# Altium PCB WIFI_BoardV4.00.PcbDoc (part 3 of 3)
Units mil, origin at the board's own origin, x right, y up, seen from the top; angles counter-clockwise.
Board outline 4329.7 x 2342.16 mil, 2 copper layers (Top Layer, Bottom Layer), stack 61.811 mil thick; 89 components, 60 nets, 295 pads, 130 vias.
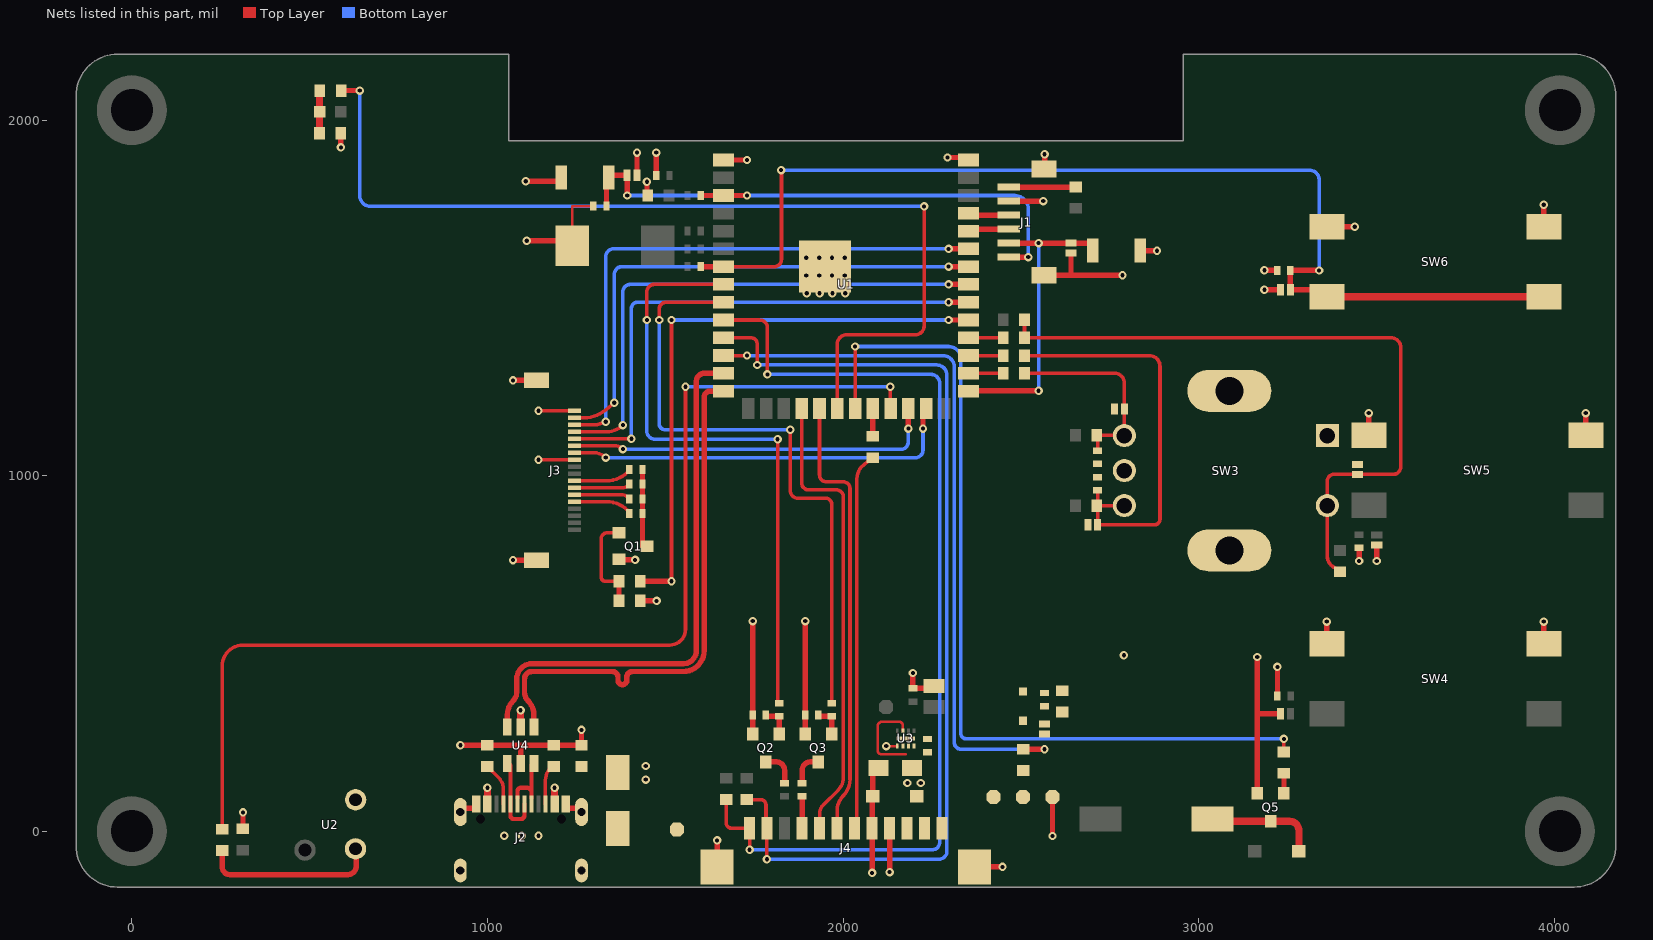
[diagram p2: the nets of this part, all layers, seen from the top]

## Via types
v1: diameter 23.62, hole 11.81, Top Layer to Bottom Layer, tented both sides, 129 vias
v2: diameter 23.62, hole 11.81, Top Layer to Bottom Layer, 1 vias

## Nets (pads, with @x,y where several pads share a name; then routed paths per layer and width w, separated by ;. In a path a pad name is that pad's centre, name@x,y a point inside that pad or via, vN(x,y) a via of type N, cw(c..) or ccw(c..) an arc to the next point about the centre after c; other vN are vias at no path point) (continued)
BTN_3: C14.2 D7.2 R21.1 SW6.1 SW6.2 U1.7 | length 3134.1
  Top Layer w10: U1.7@1664.16,1587.71 1806.66,1587.71 ccw(c1806.66,1608.06) 1827,1608.06 1827,1858.15 ccw(c1826,1858.15) v1(1826,1859.15)
  Top Layer w15: R21.1@1599.52,1587.71 U1.7@1664.16,1587.71 ; v1(3338.88,1576.73) 3338.88,1577.31 C14.2@3258,1577.31 D7.2@3258,1522.97 3340.4,1522.97 cw(c3340.4,1502.97) SW6.2@3360.4,1502.97
  Top Layer w20: SW6.2@3360.4,1502.97 SW6.1@3970.64,1502.97
  Bottom Layer w10: v1(1826,1859.15) 3311.34,1859.15 cw(c3311.34,1831.6) 3338.88,1831.6 v1(3338.88,1576.73)
BUZZER: R28.1 U1.21 | length 2499.3
  Top Layer w10: U1.21@2033.85,1188.5 v1(2033.85,1363.15) ; v1(3239.76,259.47) 3239.76,223.05 R28.1@3239.92,222.89
  Bottom Layer w10: v1(2033.85,1363.15) 2297.2,1363.15 cw(c2297.2,1328.95) 2331.4,1328.95 2331.4,274.89 ccw(c2346.29,274.89) 2346.29,260 v1@3239.76,260
ENC_CHA: C1.2 D13.2 R2.1 R33.2 SW3.A | length 561.5
  Top Layer w10: R33.2@2510.36,1287.71 2763.75,1287.71 cw(c2763.75,1260.14) 2791.33,1260.14 2791.33,1114.9 cw(c2789.83,1114.9) 2789.83,1113.4 R2.1@2713.92,1113.4 ; C1.2@2716.01,1070.06 R2.1@2716.01,1111.31
ENC_CHB: C6.2 D12.2 R3.2 R34.2 SW3.B | length 1185.9
  Top Layer w10: R34.2@2510.36,1337.71 2861.12,1337.71 cw(c2861.12,1307.36) 2891.47,1307.36 2891.47,877.48 cw(c2875.73,877.48) 2875.73,861.73 D12.2@2716.02,861.73 2716.02,912.88 ccw(c2713.92,912.88) R3.2@2713.92,914.97 SW3.B@2791.2,914.97 ; R3.2@2716.16,917.21 C6.2@2716.16,958.6
ENC_SW: D11.2 R30.2 R31.2 R32.1 SW3.2 | length 1959.3
  Top Layer w10: R30.2@2510.36,1437.71 R31.2@2510.36,1387.71 3540.91,1387.71 cw(c3540.91,1360.4) 3568.22,1360.4 3568.22,1024.62 cw(c3547.14,1024.62) 3547.14,1003.54 D11.2@3446.53,1003.54 3380,1003.54 ccw(c3380,985.6) 3362.06,985.6 SW3.2@3362.06,915.76 3362.06,773.23 ccw(c3397.59,773.23) 3380.23,742.23 3385.09,739.5 R32.1@3397.59,729.5
ESP_EN: C5.2 D4.2 J1.6 R1.1 SW1.1 U1.3 | length 1668.1
  Top Layer w15: C5.2@1334.89,1758 1334.89,1827.8 1341.52,1827.8 cw(c1358.25,1827.8) 1358.25,1844.53 D4.2@1392.96,1844.53 v1(1392.96,1787.71) ; R1.1@1599.52,1787.71 U1.3@1664.16,1787.71 v1(1730,1787.71) ; J1.6@2465.52,1614.57 v1(2521.08,1614.57) cw(c2521.08,1612.55) v1@2523.11,1612.55
  Bottom Layer w10: v1(1392.96,1787.71) v1(1730,1787.71) 2482.36,1787.71 cw(c2482.36,1749) 2521.08,1749 v1(2521.08,1614.57)
ESP_IO0: D8.2 J1.5 SW2.1 U1.27 | length 848
  Top Layer w15: U1.27@2353.14,1237.71 2353.71,1238.29 2549.43,1238.29 v1(2550,1238.86) ; J1.5@2465.52,1653.94 v1(2550,1653.94) D8.2@2641.01,1653.94 SW2.1@2701.09,1653.94
  Bottom Layer w10: v1(2550,1238.86) v1(2550,1653.94)
ESP_RXD0: J1.4 U1.36 | length 115.6
  Top Layer w15: U1.36@2353.14,1687.71 cw(c2358.74,1687.71) 2358.74,1693.31 J1.4@2465.52,1693.31
ESP_RXD1: J4.2 R22.1 U1.11 | length 2794.7
  Top Layer w10: U1.11@1664.16,1387.71 1741.01,1387.71 cw(c1741.01,1370) 1758.73,1370 v1(1758.73,1311.17) ; R22.1@1729.82,89 1768.37,89 cw(c1768.37,74) 1783.37,74 1783.37,10.94 ccw(c1786,10.94) 1786,8.31 v1(1786,-79) 1786,-84 cw(c1785,-84) v1@1785,-85
  Bottom Layer w10: v1(1758.73,1311.17) 2263.87,1311.17 cw(c2263.87,1282.81) 2292.23,1282.81 2292.23,-56.34 cw(c2269.57,-56.34) 2269.57,-79 v1(1786,-79)
ESP_RXD2: J4.6 U1.19 | length 1259.4
  Top Layer w10: U1.19@1933.85,1188.5 1933.85,1001.85 ccw(c1953.1,1001.85) 1953.1,982.6 2000.85,982.6 cw(c2000.85,963.75) 2019.7,963.75 2019.7,146.14 cw(c1953.06,146.14) 2000.18,99.01 ccw(c2040.57,58.62) 1983.46,58.62 J4.6@1983.46,8.31
ESP_TXD0: J1.3 U1.37 | length 115.3
  Top Layer w15: U1.37@2353.14,1737.71 ccw(c2358.17,1737.71) 2358.17,1732.68 J1.3@2465.52,1732.68
ESP_TXD1: J4.1 R29.1 U1.10 | length 2803.8
  Top Layer w10: U1.10@1664.16,1437.71 1764.97,1437.71 cw(c1764.97,1415.23) 1787.45,1415.23 v1(1787.45,1284.63) ; R29.1@1671,89 1671,24.42 ccw(c1687.12,24.42) 1687.12,8.31 J4.1@1737.39,8.31 v1(1737.39,-52.39)
  Bottom Layer w10: v1(1737.39,-52.39) 2250.61,-52.39 ccw(c2250.61,-30.99) 2272.01,-30.99 2272.01,1259.57 ccw(c2246.95,1259.57) 2246.95,1284.63 v1(1787.45,1284.63)
ESP_TXD2: J4.5 U1.18 | length 1304.7
  Top Layer w10: U1.18@1883.85,1188.5 1883.85,979.25 ccw(c1903.09,979.25) 1903.09,960 1981.11,960 cw(c1981.11,940.02) 2001.09,940.02 2001.09,151.46 cw(c1950.38,151.46) 1986.24,115.6 1944.17,73.54 ccw(c1968.13,49.57) 1934.24,49.57 J4.5@1934.24,8.31
GND: C1.1 C2.2 C3.1 C4.1 C5.1 C6.1 C7.2 C8.1 C9.2 C10.1 C11.1 C12.1 C13.1 C14.1 C15.1 C16.2 D2.1 D4.1 D5.1 D6.1 D7.1 D8.1 D9.1 D10.1 D11.1 D12.1 D13.1 J1.2 J1.MP1 J1.MP2 J2.A1/B12 J2.B1/A12 J2.S1 J2.S2 J2.S3 J2.S4 J3.1 J3.8 J3.MP1 J3.MP2 J4.8 J4.9 J4.MP1 J4.MP2 P3.1 Q1.2 Q2.2 Q3.2 Q5.2 R5.2 R6.2 R12.2 R17.1 R18.1 R24.1 R26.2 SW1.2 SW2.2 SW3.1 SW3.COM SW3.S1 SW3.S2 SW4.3 SW4.4 SW5.3 SW5.4 SW6.3 SW6.4 U1.1 U1.40 U1.41 U2.3 U3.5 U3.9 U4.2 | length 4743
  Top Layer w7: C2.2@1238.76,1660.42 1238.76,1758 C5.1@1297.89,1758 ; v1(2121.58,239.29) U3.5@2152.52,239.29
  Top Layer w10: v1(1143.71,1044.66) J3.8@1244.48,1044.66 ; v1(1143.71,1182.46) J3.1@1244.48,1182.46
  Top Layer w15: C16.2@312.52,6.82 v1(312.52,53) ; R26.2@587,1961.95 cw(c587.94,1961.95) R26.2@587.94,1962.89 v1(587.94,1922.94) ; J2.S4@924.02,53.95 924.02,54.99 933.45,64.43 964,64.43 968.31,68.74 J2.A1/B12@968.31,76.39 ; v1(924.02,241.75) R5.2@999.8,241.75 999.8,241.97 1093.32,241.97 ; v1@1070,1266 cw(c1071.89,1266) v1(1071.89,1267.89) J3.MP1@1138.18,1267.89 ; v1(1071.89,762.38) J3.MP2@1138.18,762.38 ; U4.2@1093.32,190.4 1093.32,241.97 ; v1@1108,1658 cw(c1110.42,1658) v1(1110.42,1660.42) C2.2@1238.76,1660.42 ; v1(1108,1827.8) SW1.2@1207.66,1827.8 ; J2.B1/A12@1224.59,64.43 J2.S1@1255.13,64.43 ; v1(1264.57,285) C11.1@1264.57,241.75 R6.2@1186.88,241.75 1186.88,241.97 1093.32,241.97 ; Q1.2@1370.22,764.27 ccw(c1371.49,764.27) 1371.49,763 v1(1415.21,763) ; D4.1@1420.52,1844.53 v1(1420.52,1908.34) ; R12.2@1430.21,647.68 v1(1475.63,647.68) ; C4.1@1448.52,1787.71 v1(1448.52,1826.28) ; v1@1449,1827.8 cw(c1449,1826.28) v1@1450.52,1826.28 ; C3.1@1475.02,1844.53 v1(1475.02,1908.34) ; v1@1644,-24 cw(c1644,-25.86) v1(1645.86,-25.86) J4.MP1@1645.86,-100.35 ; U1.1@1664.16,1887.71 v1(1730,1887.71) ; Q2.2@1745.97,273.74 R17.1@1745.97,326.39 v1(1745.97,591) ; Q3.2@1893.6,273.74 R18.1@1893.6,326.39 v1(1893.6,591) ; v1@2080,-119 ccw(c2080,-117.12) v1(2081.88,-117.12) J4.8@2081.88,8.31 2081.88,96.26 cw(c2083.5,96.26) D2.1@2083.5,97.89 2083.5,161.79 cw(c2099.6,161.79) C9.2@2099.6,177.89 ; v1@2129,-117.12 ccw(c2129,-115.03) v1(2131.09,-115.03) J4.9@2131.09,8.31 ; v1(2196.49,445) C8.1@2196.49,401.61 2250.44,401.61 ccw(c2250.44,407.67) C7.2@2256.49,407.67 ; v1(2293.71,1894.71) U1.40@2353.14,1894.71 ; J4.MP2@2370.26,-100.35 v1(2448.35,-100.35) cw(c2448.35,-102) v1@2450,-102 ; J1.2@2465.52,1772.05 v1(2562.87,1772.05) cw(c2562.87,1770) v1@2564.93,1770 ; J1.MP2@2564.93,1563.39 2641.01,1563.39 ; J1.MP1@2564.93,1862.6 ccw(c2564.93,1864.68) 2567,1864.68 v1(2567,1904) ; v1(2589.04,-13.59) P3.1@2589.04,95.89 ; D8.1@2641.01,1626.38 2641.01,1563.39 ; v1(2786,1563.39) 2641.01,1563.39 ; SW2.2@2836.06,1632.53 v1(2883,1632.53) ; Q5.2@3165.12,106.87 3165.12,330.55 ; v1(3165.12,490) 3165.12,330.55 ; v1(3185,1522.97) D7.1@3230.44,1522.97 ; v1(3185,1577.31) C14.1@3221,1577.31 ; C12.1@3221.72,380.2 v1(3221.72,462) ; D5.1@3230.44,330.55 3165.12,330.55 ; v1@3358,592 cw(c3358,589.6) v1(3360.4,589.6) SW4.4@3360.4,527.4 ; SW6.4@3377,1699.82 v1(3439.2,1699.82) ; v1(3451.42,759.89) C13.1@3451.42,796.72 ; SW5.4@3478.51,1113.61 v1(3478.51,1175.81) ; v1(3501,759.89) D6.1@3501,805.44 ; SW4.3@3970.64,527.4 v1(3970.64,589.6) ; SW6.3@3970.64,1699.82 v1(3970.64,1762.02) ; SW5.3@4088.75,1113.61 v1(4088.75,1175.81)
  other v1: 2790,495 1898,1512.88 1934.07,1512.88 1970.13,1512.88 2006.2,1512.88 1896.81,1563 1932.87,1563 1968.94,1563 2005,1563 1896.81,1612.71 1932.87,1612.71 1968.94,1612.71 2005,1612.71
HC_SET: J4.7 R25.1 | length 1061.4
  Top Layer w10: J4.7@2032.67,8.31 2038.93,35.2 2038.93,990.95 ; 2038.93,991 cw(c2088.79,990.95) 2057.93,1030.11 2071.35,1040.68 R25.1@2083.85,1050.68
MCU_BOOT: R16.2 U1.8 | length 1742.8
  Top Layer w10: v1(1448.37,1437.71) 1448.37,1517.12 cw(c1468.96,1517.12) 1468.96,1537.71 U1.8@1664.16,1537.71 ; R16.2@1816.13,359.89 v1(1816.13,1102.36)
  Bottom Layer w10: v1(1448.37,1437.71) 1448.37,1125.13 ccw(c1471.14,1125.13) 1471.14,1102.36 v1(1816.13,1102.36)
MCU_RST: R15.2 U1.9 | length 1761.9
  Top Layer w10: v1(1483,1437.71) 1483,1468 cw(c1502.71,1468) 1502.71,1487.71 U1.9@1664.16,1487.71 ; v1(1851.57,1129) 1851.57,957.66 ccw(c1872.54,957.66) 1872.54,936.68 1950.47,936.68 cw(c1950.47,918.74) 1968.41,918.74 R15.2@1968.41,359.89
  Bottom Layer w10: v1(1483,1437.71) 1483,1146 ccw(c1500,1146) 1500,1129 v1(1851.57,1129)
NetD3_1: D3.1 LS1.2 Q5.3 | length 315.7
  Top Layer w20: LS1.2@3039.03,28.13 Q5.3@3202.52,28.13 3255.4,28.13 cw(c3255.4,1.53) 3282.01,1.53 D3.1@3282.01,-56
NetJ1_1: J1.1 R4.2 | length 188.4
  Top Layer w15: J1.1@2465.52,1811.42 R4.2@2653.92,1811.42
NetJ2_A5: J2.A5 R5.1 | length 122.1
  Top Layer w10: R5.1@999.8,181.75 1031.58,149.98 1031.65,149.91 cw(c999.17,117.46) 1045.08,117.49 1045.08,117.42 J2.A5@1045.08,76.39
NetJ2_B5: J2.B5 R6.1 | length 115.3
  Top Layer w10: J2.B5@1163.19,76.39 1163.19,143.71 ; 1163.19,143.75 cw(c1211.3,143.75) 1174.38,174.6 R6.1@1186.88,181.75
NetJ3_11: J3.11 R10.2 | length 165.4
  Top Layer w10: J3.11@1244.48,985.61 1335.05,985.61 ccw(c1335.05,1071.44) 1394.96,1009.97 R10.2@1398.96,1017.47
NetJ3_12: J3.12 R9.2 | length 158.1
  Top Layer w10: J3.12@1244.48,965.92 1379.86,965.92 ccw(c1379.86,991.33) 1394.95,970.89 R9.2@1398.95,976.09
NetJ3_13: J3.13 R8.2 | length 158.3
  Top Layer w10: J3.13@1244.48,946.24 1375.69,946.24 cw(c1375.69,914.67) 1394.95,939.68 R8.2@1398.95,934.72
NetJ3_14: J3.14 R7.2 | length 165.4
  Top Layer w10: J3.14@1244.48,926.55 1335.05,926.55 cw(c1335.05,840.72) R7.2@1394.96,902.19 ; R7.2@1394.96,902.19 R7.2@1398.96,894.69
NetLED1_2: LED1.2 R26.1 SB1.2 | length 120.6
  Top Layer w10: SB1.2@527.94,2081.93 cw(c528.9,2081.93) SB1.2@528.9,2082.89
  Top Layer w20: R26.1@527.94,1962.89 SB1.2@527.94,2081.93
NetQ1_1: Q1.1 R11.2 R12.1 | length 279.4
  Top Layer w10: R11.2@1370.22,702.67 1332.59,702.67 cw(c1332.59,715.45) 1319.81,715.45 1319.81,822 cw(c1336.89,822) 1336.89,839.08 Q1.1@1370.22,839.08
  Top Layer w15: R12.1@1370.21,647.68 R11.2@1370.22,702.67
NetQ1_3: Q1.3 R7.1 R8.1 R9.1 R10.1 | length 215.8
  Top Layer w15: Q1.3@1435.96,801.67 R10.1@1435.96,1017.47
NetQ2_1: Q2.1 R16.1 R17.2 | length 83.5
  Top Layer w15: R17.2@1786.47,322.89 R16.1@1820.77,322.89 Q2.1@1820.77,273.74
NetQ2_3: Q2.3 R13.1 | length 102.2
  Top Layer w15: Q2.3@1783.37,195 1811.77,195 cw(c1811.77,170.95) 1835.82,170.95 R13.1@1835.82,134.89
NetQ3_1: Q3.1 R15.1 R18.2 | length 83.5
  Top Layer w15: R18.2@1934.1,322.89 R15.1@1968.41,322.89 Q3.1@1968.41,273.74
NetQ3_3: Q3.3 R14.1 | length 95.8
  Top Layer w15: R14.1@1885.03,134.89 1885.03,170.95 cw(c1909.08,170.95) 1909.08,195 Q3.3@1931.01,195
NetQ5_1: Q5.1 R28.2 | length 56
  Top Layer w15: Q5.1@3239.92,106.87 R28.2@3239.92,162.89
NetR25_2: R25.2 U1.22 | length 77.8
  Top Layer w15: R25.2@2083.85,1110.68 U1.22@2083.85,1188.5
NetR27_2: R27.2 U2.2 | length 498.6
  Top Layer w15: R27.2@253.88,-54.34 253.88,-99.88 ccw(c276,-99.88) 276,-122 607,-122 ccw(c607,-98) 631,-98 631,-51.6 ccw(c628.97,-51.6) U2.2@628.97,-49.57
NetR31_1: R31.1 U1.30 | length 97.2
  Top Layer w10: U1.30@2353.14,1387.71 R31.1@2450.36,1387.71
NetR33_1: R33.1 U1.28 | length 97.2
  Top Layer w10: U1.28@2353.14,1287.71 R33.1@2450.36,1287.71
NetR34_1: R34.1 U1.29 | length 97.2
  Top Layer w10: U1.29@2353.14,1337.71 R34.1@2450.36,1337.71
NRST: J4.4 R14.2 | length 89.6
  Top Layer w15: J4.4@1885.03,8.31 R14.2@1885.03,97.89
PIR_OUT: R27.1 U1.23 | length 3140.9
  Top Layer w10: R27.1@253.88,5.66 253.88,464.11 cw(c313.1,464.11) 313.1,523.34 1512.53,523.34 ccw(c1512.53,567.81) 1557,567.81 v1(1557,1250) ; v1(2133,1250) 2133,1189.35 ccw(c2133.85,1189.35) U1.23@2133.85,1188.5
  Bottom Layer w10: v1(1557,1250) v1(2133,1250)
PWR: C9.1 C10.2 C11.2 D1.1 D2.2 J4.10 J4.11 P4.1 U3.3 U3.6 U3.7 U3.8 | length 252
  Top Layer w7: U3.3@2168.27,282.4 2168.27,296.59 ccw(c2156.89,296.59) 2156.89,307.97 2110.39,307.97 ccw(c2110.39,294.81) 2097.22,294.81 2097.22,227.82 ccw(c2109.16,227.82) 2109.16,215.89 2176.14,215.89
  other v1: 2181,135.46 2218.77,135.46 1445,145 1445,183.41
SNS_IN: SB1.1 U1.20 | length 2744.2
  Top Layer w10: v1(640.89,2082.89) ccw(c640.89,2084) v1@642,2084 ; U1.20@1983.85,1188.5 1983.85,1369.82 cw(c2010.5,1369.82) 2010.5,1396.47 2203.55,1396.47 ccw(c2203.55,1420.92) 2228,1420.92 v1(2228,1757)
  Top Layer w15: SB1.1@588.9,2082.89 v1(640.89,2082.89)
  Bottom Layer w10: v1(640.89,2082.89) 640.89,1787.81 ccw(c671.7,1787.81) 671.7,1757 v1(2228,1757)
TFT_BKL: R11.1 U1.31 | length 1658
  Top Layer w10: v1(1517.63,702.67) 1517.63,764.14 v1(1517.63,1437.71)
  Top Layer w15: R11.1@1430.22,702.67 v1(1517.63,702.67) ; v1(2296.78,1437.71) U1.31@2353.14,1437.71
  Bottom Layer w10: v1(1517.63,1437.71) v1(2296.78,1437.71)
TFT_CS: J3.5 U1.32 | length 1494.8
  Top Layer w10: J3.5@1244.48,1103.72 v1(1404.9,1103.72) v1@1410.63,1103.72
  Top Layer w15: v1(2296.78,1487.71) U1.32@2353.14,1487.71
  Bottom Layer w10: v1(1404.9,1103.72) 1404.9,1470.74 cw(c1421.87,1470.74) 1421.87,1487.71 v1(2296.78,1487.71) ; v1@1410.63,1100 v1@1410.63,1103.72
TFT_D/C: J3.4 U1.33 | length 1500.6
  Top Layer w10: J3.4@1244.48,1123.4 1335.66,1123.4 ccw(c1335.66,1187.37) 1376.21,1137.89 ccw(c1335.66,1187.37) v1(1380.9,1142.14)
  Top Layer w15: v1(2296.78,1537.71) U1.33@2353.14,1537.71
  Bottom Layer w10: v1(1380.9,1142.14) 1380.63,1142.4 1380.63,1516.59 cw(c1401.75,1516.59) 1401.75,1537.71 v1(2296.78,1537.71)
TFT_MISO: J3.7 U1.25 | length 1112.8
  Top Layer w10: J3.7@1244.48,1064.35 1299.59,1064.35 cw(c1299.59,1017.3) v1(1332.86,1050.57)
  Top Layer w15: v1(2224.85,1132.14) U1.25@2224.85,1188.5
  Bottom Layer w10: v1(1332.86,1050.57) 2203.44,1050.57 ccw(c2203.44,1071.98) 2224.85,1071.98 v1(2224.85,1132.14)
TFT_MOSI: J3.6 U1.24 | length 1047.7
  Top Layer w10: J3.6@1244.48,1084.03 1357.74,1084.03 cw(c1357.74,1051.29) v1(1380.9,1074.44)
  Top Layer w15: v1(2183.85,1132.14) U1.24@2183.85,1188.5
  Bottom Layer w10: v1(1380.9,1074.44) 2164.44,1074.44 ccw(c2164.44,1093) 2183,1093 2183,1131.29 cw(c2183.85,1131.29) v1(2183.85,1132.14)
TFT_RESET: J3.2 U1.34 | length 1494.5
  Top Layer w10: J3.2@1244.48,1162.77 1257.59,1162.77 1271.18,1162.77 ccw(c1271.08,1259.08) 1332.34,1184.77 v1(1356.67,1204.78) cw(c1363.01,1197.05) v1(1356.67,1204.78)
  Top Layer w15: v1(2296.78,1587.71) U1.34@2353.14,1587.71
  Bottom Layer w10: v1(1356.67,1204.78) 1356.67,1565.85 cw(c1378.54,1565.85) 1378.54,1587.71 v1(2296.78,1587.71)
TFT_SCLK: J3.3 U1.35 | length 1584.8
  Top Layer w10: J3.3@1244.48,1143.09 1301.41,1143.09 1303.81,1143.09 ccw(c1303.81,1178.43) 1316.53,1145.46 v1(1332.86,1151.76)
  Top Layer w15: v1(2296.78,1637.71) U1.35@2353.14,1637.71
  Bottom Layer w10: v1@1332.86,1153.76 1332.86,1616.02 cw(c1354.55,1616.02) 1354.55,1637.71 v1(2296.78,1637.71)
TYPEC_N: U1.13 U4.6 | length 1539.5
  Top Layer w15: U4.6@1055.92,293.55 1055.92,327.18 cw(c1110.82,327.18) 1072,366 ccw(c1047.09,390.91) 1082.32,390.91 1082.32,428.32 cw(c1125,428.32) 1125,471 1550.73,471 ccw(c1550.73,507.79) 1587.52,507.79 1587.52,1265.71 cw(c1609.52,1265.71) 1609.52,1287.71 U1.13@1664.16,1287.71
TYPEC_P: U1.14 U4.4 | length 1519.5
  Top Layer w15: U4.4@1130.72,293.55 1130.72,327.18 ccw(c1075.82,327.18) 1114.64,366 cw(c1139.55,390.91) 1104.32,390.91 1104.32,428.32 cw(c1125,428.32) 1125,449 1319.57,449 1352.07,449 cw(c1352.07,434) 1367.07,434 1367.07,424.63 ccw(c1379.57,424.63) 1392.07,424.63 1392.07,434 cw(c1407.07,434) 1407.07,449 1452.71,449 1550.73,449 ccw(c1550.73,507.79) 1609.52,507.79 1609.52,1219.98 cw(c1627.25,1219.98) 1627.25,1237.71 U1.14@1664.16,1237.71
U_VBUS: D1.2 J2.A4/B9 J2.B4/A9 P2.1 U4.5 | length 137.7
  Top Layer w20: J2.A4/B9@999.8,76.39 v1(999.8,122) ; U4.5@1093.32,293.55 v1(1093.32,340) ; J2.B4/A9@1188.78,76.39 v1(1188.78,122)
  other v1: 1047.48,-12.77 1097.04,-12.77 1143.51,-12.77
USBD_N: J2.A7 J2.B7 U4.1 | length 234.3
  Top Layer w12: U4.1@1055.92,190.4 cw(c1055.92,181.55) 1064.76,181.55 1064.76,44 ccw(c1074.5,44) 1074.5,34.27 1094.29,34.27 ccw(c1094.29,44.11) 1104.13,44.11 J2.A7@1104.13,76.39
USBD_P: J2.A6 J2.B6 U4.3 | length 173.3
  Top Layer w12: J2.A6@1084.45,92.51 1084.45,112.16 cw(c1094.29,112.16) 1094.29,122 1111.8,122 cw(c1111.8,109.98) 1123.82,109.98 ; J2.B6@1123.82,92.51 1123.82,183.5 cw(c1130.72,183.5) U4.3@1130.72,190.4
VCC_12V: J4.12 P5.1 R23.2
VCC_ADC: C15.2 D9.2 D10.2 R23.1 R24.2 U1.12 | length 2048.1
  Top Layer w10: U1.12@1664.16,1337.71 v1(1730,1337.71)
  Top Layer w15: R23.1@2506.28,230.51 v1(2566.59,230.51)
  Bottom Layer w10: v1(1730,1337.71) 2281.05,1337.71 cw(c2281.05,1305.89) 2312.88,1305.89 2312.88,249.63 ccw(c2332.01,249.63) 2332.01,230.51 v1(2566.59,230.51)
pads on no net: J2.A8 J2.B8 J2.MH J3.15 J3.16 J3.17 J3.18 U1.4 U1.15 U1.16 U1.17 U1.26 U1.38 U1.39

## Polygon pours and split planes (outlines as drawn)
GND on Bottom Layer "NONET_L-01_P-001" (solid, remove dead copper, pour order 7): -156.47,-41.36 -156.47,2071.73 -156.47,2068.66 cw(c-40.09,2068.66) -40.09,2185.04 1060.01,2185.04 1060.01,1941.42 2956.91,1941.42 2956.91,2185.04 4055.12,2185.04 cw(c4055.12,2066.93) 4173.23,2066.93 4173.23,-39.63 cw(c4055.74,-39.63) 4055.74,-157.12 -40.71,-157.12 cw(c-40.71,-41.36)
GND on Top Layer "NONET_L-01_P-001" (solid, remove dead copper, pour order 9): -156.47,-41.36 -156.47,2071.73 -156.47,2068.66 cw(c-40.09,2068.66) -40.09,2185.04 1060.01,2185.04 1060.01,1941.42 2956.91,1941.42 2956.91,2185.04 4055.12,2185.04 cw(c4055.12,2066.93) 4173.23,2066.93 4173.23,-39.63 cw(c4055.74,-39.63) 4055.74,-157.12 -40.71,-157.12 cw(c-40.71,-41.36)
PWR on Top Layer "NONET_L-01_P-001" (solid, pour order 5): 1447.91,213.84 cw(c1447.91,196.75) 1465,196.75 1465,130.48 cw(c1449.93,130.48) 1449.93,115.42 1262.54,115.42 cw(c1262.54,130.89) 1247.07,130.89 1247.07,196.75 cw(c1264.49,196.75) 1261.1,213.84

## Other copper
Top Layer:
  rectangle net GND: 2225.02,250.34 2468.39,268.34
  rectangle net GND: 1448.52,1832.03 1484.02,1857.03
  rectangle net GND: 1435.52,1770.21 1465.52,1854.87
  rectangle net GND: 1858.46,1487.71 2045,1660.55
  rectangle net GND: 2148.58,232.5 2156.46,266.75
  rectangle net GND: 2150.55,254.94 2237.52,266.75
  rectangle net GND: 2703.42,986.84 2789.83,1041.97
  rectangle net NetQ1_3: 1426.96,785.53 1491.63,1029.97
  region net 3V3_WIFI: 2665.02,-7.3 2665.02,138.02 cw(c2684,138.02) 2684,157 2763,157 cw(c2763,136.87) 2783.13,136.87 2783.13,-7.3
  region net 3V3_WIFI: 1318.47,999.39 ccw(c1318.47,1008.34) 1327.42,1008.34 1327.42,1022.11 ccw(c1318.64,1022.11) 1318.64,1030.88 1226.37,1030.88 1226.37,999.39 1226.37,1030.88 1226.37,999.39
  region net U_VBUS: 1303.36,24.36 1303.36,56.36 1543.03,56.36 cw(c1543.04,32.24) 1567.16,32.24 1567.16,-25.04 cw(c1545.26,-25.04) 1545.26,-46.95 1006.95,-46.95 cw(c1006.94,-27.99) 987.99,-27.99 987.99,12.77 ccw(c988,27.65) 1002.87,27.65 1002.87,41.16 ccw(c988,41.16) 993.14,55.12 993.14,100.01 1011.61,100.01 1011.61,37.71 ccw(c1031.65,37.71) 1031.65,17.68 1156.51,17.68 ccw(c1156.51,38.14) 1176.97,38.14 1176.97,100.01 1195.64,100.01 1195.64,55.4 ccw(c1195.64,45.56) 1185.79,45.56 1185.79,14.21 ccw(c1203.77,14.2) 1203.77,-3.77 1275.23,-3.77 ccw(c1275.23,24.36)
  region net PWR: 2218.77,239.29 2440.61,239.29 cw(c2440.61,217.9) 2462,217.9 2462,74.8 cw(c2444.33,74.8) 2444.33,57.13 2245.27,57.13 2245.27,-23.58 2164.56,-23.58 2164.56,246.08 2218.77,246.08
  region net 3V3_WIFI: 2420.23,373.51 cw(c2420.23,356.37) 2437.37,356.37 2437.37,301.39 cw(c2418.15,301.39) 2418.15,282.18 2218.77,282.18 2218.77,275.61 2180.08,275.61 2180.08,298.54 ccw(c2156.89,298.54) 2156.89,321.74 2092.05,321.74 2092.05,373.51
  region net VCC_ADC: 2579.59,296.26 2630.24,296.26 ccw(c2630.24,307.21) 2641.2,307.21 2641.19,348.61 ccw(c2630.22,348.61) 2630.22,359.59 2499.53,359.59 ccw(c2499.53,348.85) 2488.78,348.84 2488.78,215.51 2523.78,215.51 2523.78,283.97 cw(c2536.07,283.97) 2536.07,296.26
  region net VCC_12V: 2509.78,-23.58 ccw(c2509.78,-7.39) 2525.96,-7.39 2525.96,185.51 2486.59,185.51 2486.59,56.59 cw(c2470.2,56.59) 2470.2,40.2 2262.98,40.2 2262.98,-23.58
  region net 3V3_WIFI: 1571.52,1575.21 1357.66,1575.21 1357.66,1757 1493.52,1757 1493.52,1822.03 1493.52,1887.71 1620,1887.71 1620,1855.43 1693.69,1855.43 1693.69,1820 1571.52,1820
Bottom Layer:
  region net 3V3_WIFI: 157 vertices and 0 holes, not listed, extent 1191.52,78 3447.15,1772.55
  region net PWR: 1410,177.78 cw(c1435,177.78) 1435,202.78 2206.34,202.78 cw(c2206.6,176.62) 2232.76,176.89 2232.76,117.76 cw(c2205,117.76) 2205,90 1433.5,90 cw(c1433.5,113.5) 1410,113.5
  region net 3V3_WIFI: 1371.15,1783.38 1374.08,1776.29 1372.31,1772.29 1191.52,1772.29 1191.52,1787.71 1371.15,1787.71
  region net U_VBUS: 1196,365 1199.05,365 1205.04,363.81 1210.68,361.47 1215.76,358.08 1220.08,353.76 1223.47,348.68 1225.81,343.04 1226.87,337.7 1227,334 1227,79.21 1226.52,75.6 1226.52,52.44 1222.83,50.91 1220.65,53.09 1212.49,56.47 1203.65,56.47 1195.49,53.09 1189.25,46.84 1185.87,38.68 1185.87,29.85 1189.25,21.69 1195.49,15.44 1203.65,12.06 1212.49,12.06 1220.65,15.44 1223,17.79 1227,16.14 1227,-6 1227,-9.15 1225.77,-15.33 1223.36,-21.16 1219.86,-26.4 1215.4,-30.86 1210.16,-34.36 1204.33,-36.77 1198.15,-38 1195,-38 1009,-38 1005.65,-38 999.08,-36.69 992.89,-34.13 987.33,-30.41 982.59,-25.67 978.87,-20.11 976.31,-13.92 975,-7.35 975,-4 975,11.33 976.09,12.06 984.93,12.06 993.09,15.44 999.34,21.69 1002.72,29.85 1002.72,38.68 999.34,46.84 993.09,53.09 984.93,56.47 979,56.47 975,60.02 975,75.6 975,333 975,336.15 976.23,342.33 978.64,348.16 982.14,353.4 986.6,357.86 991.84,361.36 997.67,363.77 1003.85,365 1007,365

## Silkscreen, mask and mechanical layers (free items; w line width, h text height)
Top Overlay:
  text "3V3" at 2140.01,385.08 h50 r90
  text "PWR" at 2435.84,135.29 h50 r90
  text "VBUS" at 1546.67,47.4 h50 r90
  text "GND" at 2602.26,-27.21 h50 r90
  text "12V" at 2524.7,-32.53 h50 r90
Board Outline:
  lines w10: -156.47,2068.66 cw(c-40.09,2068.66) -40.09,2185.04 1060.01,2185.04 1060.01,1941.42 2956.91,1941.42 2956.91,2185.04 4055.12,2185.04 cw(c4055.12,2066.93) 4173.23,2066.93 4173.23,-39.63 cw(c4055.74,-39.63) 4055.74,-157.12 -40.71,-157.12 cw(c-40.71,-41.36) -156.47,-41.36 -156.47,2071.73
Fabrication:
  drawing of 191 lines, arcs and shapes, not listed
  text "Layer" at 4905.34,2082 h60
  text "Name" at 5315.26,2082 h60
  text "Material" at 6245,2082 h60
  text "Thickness" at 7104.77,2082 h60
  text "Constant" at 7754.6,2082 h60
  text "Board Layer Stack" at 8324.46,2082 h60
  text "Top Overlay" at 5315.26,1962 h60
  text "Top Solder" at 5315.26,1842 h60
  text "Solder Resist" at 6245,1842 h60
  text "0.010mm" at 7104.77,1842 h60
  text "3.5" at 7754.6,1842 h60
  text "1" at 4905.34,1722 h60
  text "Top Layer" at 5315.26,1722 h60
  text "0.035mm" at 7104.77,1722 h60
  text "Dielectric 1" at 5315.26,1602 h60
  text "FR-4" at 6245,1602 h60
  text "1.500mm" at 7104.77,1602 h60
  text "4.6" at 7754.6,1602 h60
  text "2" at 4905.34,1482 h60
  text "Bottom Layer" at 5315.26,1482 h60
  text "0.035mm" at 7104.77,1482 h60
  text "Bottom Solder" at 5315.26,1362 h60
  text "Solder Resist" at 6245,1362 h60
  text "0.010mm" at 7104.77,1362 h60
  text "3.5" at 7754.6,1362 h60
  text "Bottom Overlay" at 5315.26,1242 h60
  text "Total board thickness:" at 4905.34,1122 h60
  text "1.590mm" at 7104.77,1122 h60
Mechanical 13:
  circle w10: c3055.11,1013.4 r492.13
  lines w10: -67.99,188.41 2294.21,188.41 2294.21,1841.96 -67.99,1841.96 -67.99,188.41
Drill Drawing:
  circle w10: c-53.38,3703.27 r33.33
  circle w10: c-53.38,3403.27 r20
  circle w10: c-53.38,3403.27 r33.33
  lines w10: -86.71,3253.27 -53.38,3219.94 -20.04,3253.27 -53.38,3286.61 -86.71,3253.27 ; -86.71,3519.94 -20.04,3519.94 -20.04,3586.61 -86.71,3586.61 -86.71,3519.94 ; -86.71,3819.94 -20.04,3819.94 -20.04,3886.61 -86.71,3886.61 -86.71,3819.94 ; -86.71,3969.94 -86.71,3986.61 -70.04,4003.27 -86.71,4019.94 -86.71,4036.61 -70.04,4036.61 -53.38,4019.94 -36.71,4036.61 -20.04,4036.61 -20.04,4019.94 -36.71,4003.27 -20.04,3986.61 -20.04,3969.94 -36.71,3969.94 -53.38,3986.61 -70.04,3969.94 -86.71,3969.94 ; -86.71,4136.61 -70.04,4136.61 -70.04,4119.94 -36.71,4119.94 -36.71,4136.61 -20.04,4136.61 -20.04,4169.94 -36.71,4169.94 -36.71,4186.61 -70.04,4186.61 -70.04,4169.94 -86.71,4169.94 -86.71,4136.61 ; -86.71,4269.94 -53.38,4286.61 -20.04,4269.94 -36.71,4303.27 -20.04,4336.61 -53.38,4319.94 -86.71,4336.61 -70.04,4303.27 -86.71,4269.94 ; -73.38,3833.27 -33.38,3833.27 -33.38,3873.27 -73.38,3873.27 -73.38,3833.27
  lines w15: -146.5,3174.94 7513.39,3174.94 ; -146.5,4374.94 7513.39,4374.94 ; 404.38,3024.94 404.38,4524.94 ; 994.22,3024.94 994.22,4524.94 ; 2113.89,3024.94 2113.89,4524.94 ; 2619.77,3024.94 2619.77,4524.94 ; 3353.57,3024.94 3353.57,4524.94 ; 4853.12,3024.94 4853.12,4524.94 ; 5442.97,3024.94 5442.97,4524.94 ; 6188.77,3024.94 6188.77,4524.94 ; -146.5,3024.94 7513.39,3024.94 7513.39,4524.94 -146.5,4524.94 -146.5,3024.94
  text "Symbol" at -56.5,4419.94 h72
  text "Count" at 449.38,4419.94 h72
  text "Hole Size" at 1039.22,4419.94 h72
  text "Plated" at 2158.89,4419.94 h72
  text "Hole Type" at 2664.77,4419.94 h72
  text "Drill Layer Pair" at 3398.57,4419.94 h72
  text "Via/Pad" at 4898.12,4419.94 h72
  text "Pad Shape" at 5487.97,4419.94 h72
  text "Template" at 6233.77,4419.94 h72
  text "2" at 449.38,4269.94 h60
  text "0.600mm (23.62mil)" at 1039.22,4269.94 h60
  text "PTH" at 2158.89,4269.94 h60
  text "Slot" at 2664.77,4269.94 h60
  text "Top Layer - Bottom Layer" at 3398.57,4269.94 h60
  text "Pad" at 4898.12,4269.94 h60
  text "Rounded" at 5487.97,4269.94 h60
  text "r90_170h60_140r45" at 6233.77,4269.94 h60
  text "2" at 449.38,4119.94 h60
  text "0.600mm (23.62mil)" at 1039.22,4119.94 h60
  text "PTH" at 2158.89,4119.94 h60
  text "Slot" at 2664.77,4119.94 h60
  text "Top Layer - Bottom Layer" at 3398.57,4119.94 h60
  text "Pad" at 4898.12,4119.94 h60
  text "Rounded" at 5487.97,4119.94 h60
  text "(Mixed)" at 6233.77,4119.94 h60
  text "2" at 449.38,3969.94 h60
  text "0.620mm (24.41mil)" at 1039.22,3969.94 h60
  text "NPTH" at 2158.89,3969.94 h60
  text "Round" at 2664.77,3969.94 h60
  text "Top Layer - Bottom Layer" at 3398.57,3969.94 h60
  text "Pad" at 4898.12,3969.94 h60
  text "Rounded" at 5487.97,3969.94 h60
  text "c0hn62" at 6233.77,3969.94 h60
  text "2" at 449.38,3819.94 h60
  text "2.000mm (78.74mil)" at 1039.22,3819.94 h60
  text "PTH" at 2158.89,3819.94 h60
  text "Rectangle" at 2664.77,3819.94 h60
  text "Top Layer - Bottom Layer" at 3398.57,3819.94 h60
  text "Pad" at 4898.12,3819.94 h60
  text "Rounded" at 5487.97,3819.94 h60
  text "r600_300h200_280r150" at 6233.77,3819.94 h60
  text "3" at 449.38,3669.94 h60
  text "0.914mm (36.00mil)" at 1039.22,3669.94 h60
  text "PTH" at 2158.89,3669.94 h60
  text "Round" at 2664.77,3669.94 h60
  text "Top Layer - Bottom Layer" at 3398.57,3669.94 h60
  text "Pad" at 4898.12,3669.94 h60
  text "Rounded" at 5487.97,3669.94 h60
  text "c152h91m163mx163p0" at 6233.77,3669.94 h60
  text "4" at 449.38,3519.94 h60
  text "3.000mm (118.11mil)" at 1039.22,3519.94 h60
  text "PTH" at 2158.89,3519.94 h60
  text "Round" at 2664.77,3519.94 h60
  text "Top Layer - Bottom Layer" at 3398.57,3519.94 h60
  text "Pad" at 4898.12,3519.94 h60
  text "Rounded" at 5487.97,3519.94 h60
  text "c500h300" at 6233.77,3519.94 h60
  text "5" at 449.38,3369.94 h60
  text "1.100mm (43.31mil)" at 1039.22,3369.94 h60
  text "PTH" at 2158.89,3369.94 h60
  text "Round" at 2664.77,3369.94 h60
  text "Top Layer - Bottom Layer" at 3398.57,3369.94 h60
  text "Pad" at 4898.12,3369.94 h60
  text "(Mixed)" at 5487.97,3369.94 h60
  text "(Mixed)" at 6233.77,3369.94 h60
  text "130" at 449.38,3219.94 h60
  text "0.300mm (11.81mil)" at 1039.22,3219.94 h60
  text "PTH" at 2158.89,3219.94 h60
  text "Round" at 2664.77,3219.94 h60
  text "Top Layer - Bottom Layer" at 3398.57,3219.94 h60
  text "Via" at 4898.12,3219.94 h60
  text "Rounded" at 5487.97,3219.94 h60
  text "(Mixed)" at 6233.77,3219.94 h60
  text "150 Total" at 449.38,3069.94 h60
  text "Slot definitions :" at -56.5,2924.97 h60
  text "Routed Path Length" at 976.19,2924.97 h60
  text "= Calculated from tool start centre position to tool end centre position." at 2078.86,2924.97 h60
  text "Hole Length" at 976.19,2824.99 h60
  text "= Routed Path Length + Tool Size = Slot length as defined in the PCB layout" at 1668.99,2824.99 h60

## Dimensions
4055.12,2185.04 to 4055.74,-157.12 on Dimensions
-156.47,2071.73 to 4173.23,2066.93 on Dimensions

## Text inside footprints (layer, text, board x,y; h text height)
C7: Top Overlay "+" at 2268.99,303.86 h25 r90
J3: Top Overlay "18" at 1199.48,861.46 h19.68 r270; Top Overlay "1" at 1198.48,1186.46 h19.68 r270
SW3: Top Overlay "1" at 3301.47,1172.19 h47.24 r270; Top Overlay "COM" at 2845,1059.34 h47.24 r270; Top Overlay "A" at 2846.47,1188.52 h47.24 r270; Top Overlay "B" at 2846.47,865.19 h47.24 r270